# Altium PCB Power_Board.PcbDoc (part 2 of 2)
Units mm, origin at the board's own origin, x right, y up, seen from the top; angles counter-clockwise.
Board outline 220 x 160 mm, 2 copper layers (Top Layer, Bottom Layer), stack 1.58 mm thick; 209 components, 107 nets, 531 pads, 153 vias.
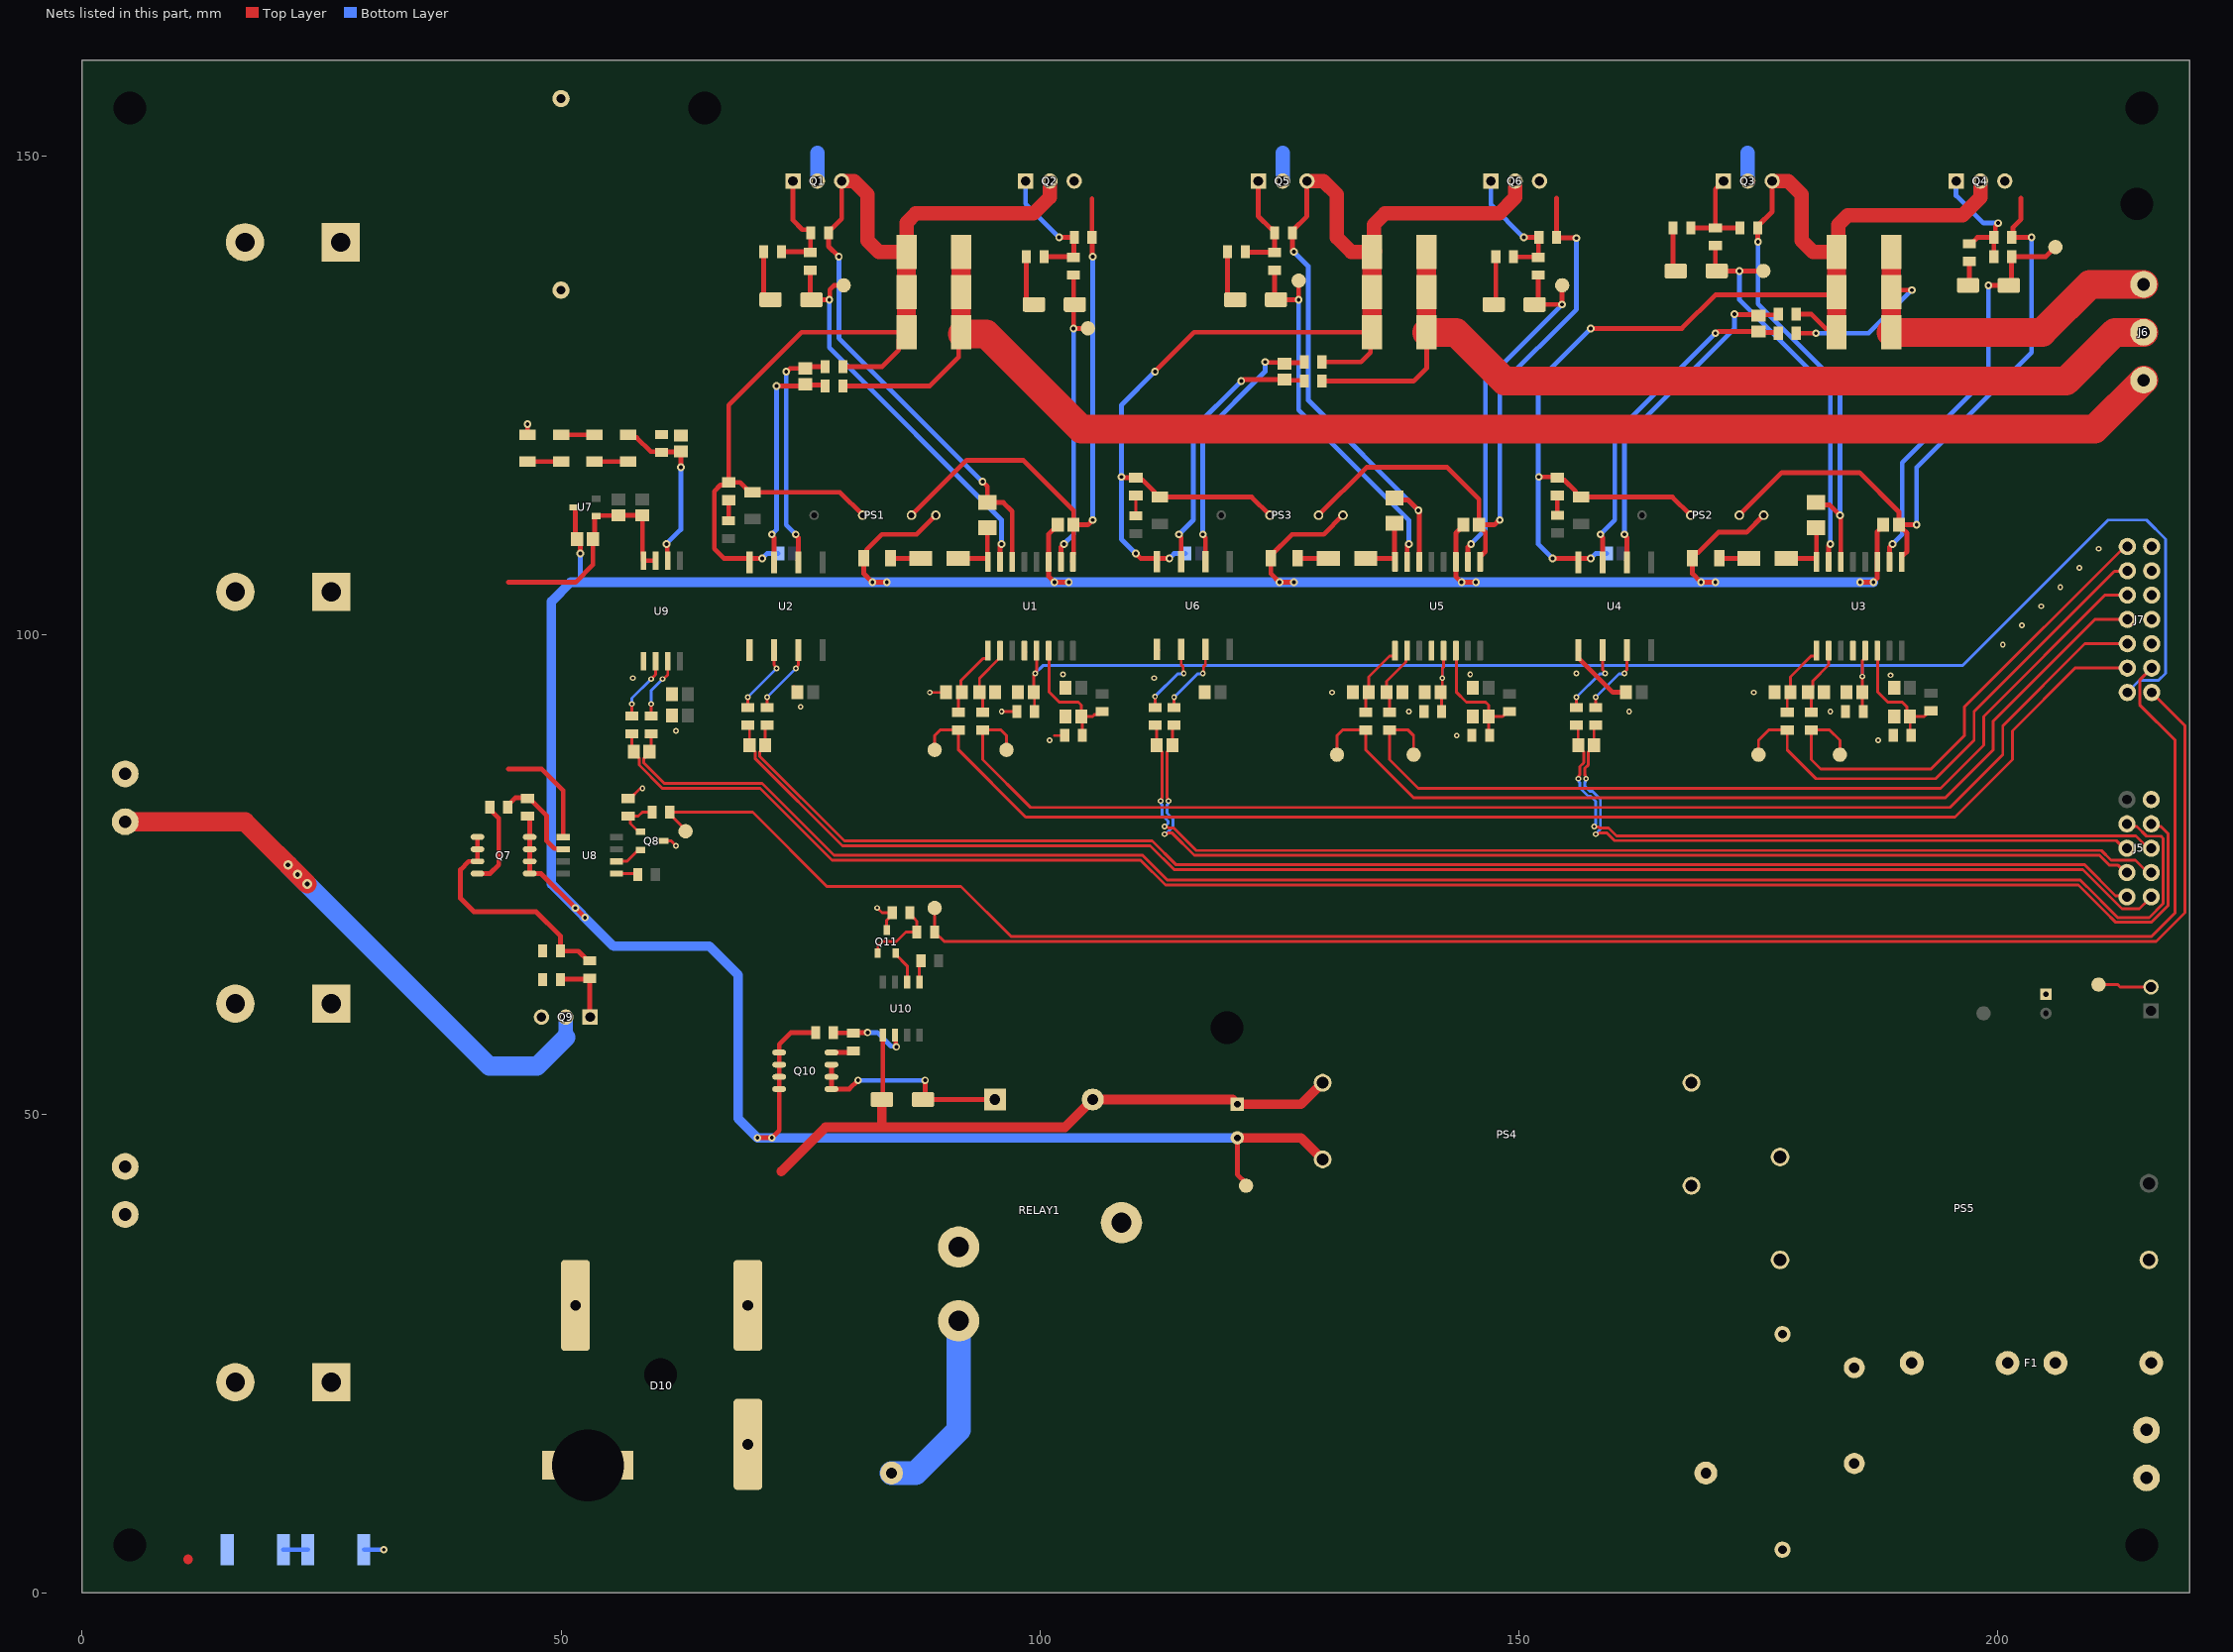
[diagram p2: the nets of this part, all layers, seen from the top]

## Via types
v1: diameter 0.8, hole 0.4, Top Layer to Bottom Layer, tented both sides, 82 vias
v2: diameter 0.6, hole 0.3, Top Layer to Bottom Layer, tented both sides, 68 vias
v3: diameter 1, hole 0.5, Top Layer to Bottom Layer, tented both sides, 3 vias

## Nets (pads, with @x,y where several pads share a name; then routed paths per layer and width w, separated by ;. In a path a pad name is that pad's centre, name@x,y a point inside that pad or via, vN(x,y) a via of type N, cw(c..) or ccw(c..) an arc to the next point about the centre after c; other vN are vias at no path point) (continued)
+12V: C3.2 C16.2 C29.2 C46.2 C48.2 PS1.1 PS2.1 PS3.1 PS4.+V Q7.5 Q7.6 Q7.7 Q7.8 Q10.5 Q10.6 Q10.7 Q10.8 R1.1 R20.1 R39.1 R62.2 R70.2 TP19.1 U1.11 U3.11 U5.11 U7.3 | length 378.4
  Top Layer w0.5: R62.2@46.5,81.075 46.725,80.85 Q7.8@46.725,78.905 Q7.7@46.725,77.635 Q7.6@46.725,76.365 Q7.5@46.725,75.095 46.744,75.076 47.924,75.076 v1(51.5,71.5) v1(52.5,70.5) ; U7.3@51.325,113.325 51.425,113.325 51.5,113.25 C48.2@51.5,110.175 ; C48.2@51.675,110 52,109.675 v1(52,108.5) ; v1(70.5,47.5) v1(72,47.5) 72.775,48.275 Q10.8@72.775,52.595 Q10.7@72.775,53.865 Q10.6@72.775,55.135 Q10.5@72.775,56.405 72.775,57.275 74,58.5 R70.2@76.575,58.5 ; v1(84,105.5) v1(82.5,105.5) 81.6,106.4 R1.1@81.6,108 81.9,108.3 81.9,108.9 83.502,110.502 87.122,110.502 PS1.1@89.12,112.5 ; C3.2@101.85,111.5 101.85,111.4 101.475,111.025 101.375,111.025 100.905,110.555 U1.11@100.905,107.64 100.905,106.095 v1(101.5,105.5) v1(103,105.5) ; C46.2@120.6,47.5 120.6,43.671 121.5,42.771 TP19.1@121.5,42.5 ; v1(126.5,105.5) v1(125,105.5) 124.1,106.4 R39.1@124.1,108 124.1,108.3 126.302,110.502 129.622,110.502 PS3.1@131.62,112.5 ; C29.2@144.175,111.5 144.175,111.4 143.405,110.63 U5.11@143.405,107.64 143.405,106.095 v1(144,105.5) v1(145.5,105.5) ; v1(170.5,105.5) v1(169,105.5) 168.1,106.4 168.1,108.3 168.4,108.6 168.7,108.6 170.822,110.722 173.762,110.722 PS2.1@175.54,112.5 ; v1(185.6,105.5) v1(187,105.5) 187,105.526 187.405,105.931 U3.11@187.405,107.64 187.405,110.805 188,111.4 C16.2@188,111.5
  Top Layer w1: C46.2@120.6,47.5 127.25,47.5 PS4.+V@129.5,45.25
  Bottom Layer w0.5: 52,105.5 v1(52,108.5)
  Bottom Layer w1: C46.2@120.6,47.5 v1(72,47.5) v1(70.5,47.5) 68.5,49.5 68.5,64.5 65.5,67.5 55.5,67.5 49,74 49,103.5 51,105.5 52,105.5 v1(82.5,105.5) v1(84,105.5) v1(101.5,105.5) v1(103,105.5) v1(125,105.5) v1(126.5,105.5) v1(144,105.5) v1(145.5,105.5) v1(169,105.5) v1(170.5,105.5) v1(185.6,105.5) v1(187,105.5)
+12V_BOOT_2: C1.1 D1.2 U1.16 | length 7.1
  Top Layer w0.5: D1.2@91.45,108 94.505,108 U1.16@94.555,107.95 ; C1.1@94.175,111.5 C1.1@94.5,111.175 94.5,108.425 94.555,108.37 U1.16@94.555,107.95 ; U1.16@94.555,107.64 U1.16@94.555,107.95
+12V_BOOT_3: C14.1 D4.2 U3.16 | length 7.4
  Top Layer w0.5: D4.2@178,108.1 D4.2@177.9,108 181.005,108 U3.16@181.055,107.95 ; C14.1@181,111.675 181.055,111.62 U3.16@181.055,107.95 ; U3.16@181.055,107.64 U3.16@181.055,107.95
+12V_BOOT_4: C27.1 D7.2 U5.16 | length 7.4
  Top Layer w0.5: D7.2@134,108 137.005,108 137.055,107.95 U5.16@137.055,107.64 ; C27.1@137,111.675 137,108.425 137.055,108.37 137.055,108.005 U5.16@137.055,107.69
+COIL_1: D11.2 Q10.1 Q10.2 Q10.3 RELAY1.A1 | length 22.3
  Top Layer w0.5: Q10.3@78.225,55.135 Q10.2@78.225,53.865 Q10.1@78.225,52.595 80.095,52.595 v1(81,53.5) ; v1(88,53.5) 88,51.73 D11.2@87.77,51.5 RELAY1.A1@95.3,51.5
  Bottom Layer w0.5: v1(81,53.5) v1(88,53.5)
+ISENSE_1_N: C24.2 J5.5 R36.2 | length 69.3
  Top Layer w0.3: v2(157,85) 156.943,85.057 156.943,85.318 156.85,85.411 156.85,86.05 157.25,86.45 157.25,87.825 157.825,88.4 157.825,90.4 R36.2@158,90.575 ; v2(158,79.2) 158.057,79.257 158.318,79.257 158.411,79.35 159.15,79.35 159.97,78.53 212.341,78.53 213.131,77.74 J5.5@213.46,77.74
  Bottom Layer w0.3: v2(157,85) 156.943,84.943 156.943,84.682 156.85,84.589 156.85,84.231 157.423,83.658 157.695,83.658 158.5,82.853 158.5,79.731 158,79.231 v2(158,79.2) ; J5.5@213.46,77.675 J5.5@213.46,77.74
+ISENSE_AUX_1: C37.2 J5.3 R55.2 | length 114.8
  Top Layer w0.3: v2(113,79.2) 113.057,79.257 113.318,79.257 113.411,79.35 113.75,79.35 116.1,77 210.599,77 211.649,75.95 212.549,75.95 213.299,75.2 J5.3@213.46,75.2 ; v2(113.4,82.671) 113.305,82.766 113.305,82.945 113.25,83 113.25,87.825 113.825,88.4 C37.2@113.825,88.5 113.825,90.4 R55.2@114,90.575
  Bottom Layer w0.3: v2(113,79.2) 113.081,79.2 113.231,79.35 113.269,79.35 113.877,79.958 113.877,80.781 113.25,81.409 113.25,82.261 113.343,82.353 113.343,82.614 v2(113.4,82.671) ; J5.3@213.379,75.2 J5.3@213.46,75.2
+ISENSE_MAIN_1: C11.2 J5.1 R17.2 | length 152.5
  Top Layer w0.3: R17.2@71.5,90.575 71.325,90.4 C11.2@71.325,88.5 71.325,88.4 70.75,87.825 70.75,87.325 79.575,78.5 111.707,78.5 114.207,76 209.059,76 212.286,72.774 213.026,72.774 213.3,72.5 J5.1@213.46,72.66
+VDC: C41.2 C42.2 C43.2 C44.2 C45.2 D10.1 J1.1 J3.1 Q1.2 Q3.2 Q5.2 R59.2 R76.2 | length 9.9
  Top Layer w0.5: R76.2@46.5,120.9 v1(46.5,122)
  Bottom Layer w1.5: Q1.2@76.75,147.4 76.75,150.35 ; Q5.2@125.32,147.4 125.32,150.32 ; 173.871,150.329 173.871,147.419 Q3.2@173.89,147.4
+VSENSE_1: C53.2 J5.7 R72.2 | length 182.2
  Top Layer w0.3: C53.2@58.8,87.375 C53.2@59.225,87.8 C53.2@59.225,87.7 ; R72.2@58.875,89.35 59.2,89.675 R72.2@59.4,89.675 59.4,87.875 C53.2@59.225,87.7 ; J5.7@213.46,80.28 213.735,80.005 214.495,80.005 215.51,78.99 217.01,78.99 217.25,78.75 217.25,71.957 215.793,70.5 212.5,70.5 211.354,71.646 210.095,72.905 208.604,74.396 113.311,74.396 110.707,77 78.5,77 71,84.5 60.775,84.5 58.65,86.625 58.65,87.125 C53.2@59.225,87.7
  Bottom Layer w0.3: J5.7@213.46,80.28 J5.7@213.839,80.28
-ISENSE_1_N: C24.1 J5.6 R38.2 | length 71.5
  Top Layer w0.3: R38.2@156,90.575 156.175,90.4 156.175,88.4 156.75,87.825 156.75,86.657 156.35,86.257 156.35,85.411 156.257,85.318 156.257,85.057 v2(156.2,85) ; v2(157.85,80) 157.907,79.943 158.318,79.943 158.411,79.85 159.357,79.85 160.177,79.03 214.382,79.03 215.672,77.74 J5.6@216,77.74
  Bottom Layer w0.3: v2(156.2,85) 156.257,84.943 156.257,84.682 156.35,84.589 156.35,84.024 157.216,83.158 157.488,83.158 158,82.645 158,80.231 157.85,80.081 v2(157.85,80) ; J5.6@215.621,77.74 J5.6@216,77.74
-ISENSE_AUX_1: C37.1 J5.4 R57.2 | length 116.8
  Top Layer w0.3: R57.2@112,90.575 112.175,90.4 C37.1@112.175,88.5 112.175,88.4 112.75,87.825 112.75,83 112.699,82.949 112.699,82.768 112.602,82.671 v2(112.6,82.671) ; v2(113,80) 113.057,79.943 113.318,79.943 113.411,79.85 113.957,79.85 116.307,77.5 210.806,77.5 211.816,76.49 214.331,76.49 215.621,75.2 J5.4@216,75.2
  Bottom Layer w0.3: v2(112.6,82.671) 112.657,82.614 112.657,82.353 112.75,82.261 112.75,81.201 113.377,80.574 113.377,80.326 113.051,80 v2(113,80) ; J5.4@215.621,75.2 J5.4@216,75.2
-ISENSE_MAIN_1: C11.1 J5.2 R19.2 | length 156.7
  Top Layer w0.3: R19.2@69.5,90.575 69.675,90.4 C11.1@69.675,88.5 69.675,88.4 70.25,87.825 70.25,87.118 79.368,78 111.5,78 114,75.5 208.852,75.5 212.942,71.41 214.75,71.41 215.755,72.415 J5.2@215.755,72.66
  Bottom Layer w0.3: J5.2@215.755,72.66 J5.2@216,72.66
-VDC: C3.1 C16.1 C29.1 C41.1 C42.1 C43.1 C44.1 C45.1 C46.1 C48.1 C49.1 C52.1 C54.1 D10.3 D11.1 J1.2 PS1.2 PS2.2 PS3.2 PS4.-V Q2.3 Q4.3 Q6.3 Q9.3 R15.1 R34.1 R53.1 R60.1 R66.2 R68.2 R80.1 RELAY1.A2 U1.9 U3.9 U5.9 U7.1 U8.5 U9.3 U9.4 U10.5 | length 311.3
  Top Layer w0.5: 44.5,86 48,86 50.225,83.775 U8.5@50.225,78.905 ; 44.5,105.5 51.5,105.5 53.325,107.325 C48.1@53.325,110 ; C48.1@53.693,109.632 C48.1@53.325,110 ; U9.3@59.865,107.75 U9.4@58.595,107.75 58.595,108.425 58.5,108.52 C52.1@58.5,112.5 C49.1@56,112.5 55.962,112.463 53.712,112.463 U7.1@53.675,112.425 53.575,112.425 53.5,112.35 53.5,110.175 C48.1@53.325,110 ; D11.1@83.5,51.5 83.595,51.595 U10.5@83.595,58.225 ; PS1.2@86.58,112.5 92.33,118.25 98.25,118.25 103.5,113 C3.1@103.5,111.5 ; U1.9@103.395,107.69 U1.9@103.445,107.64 103.445,108.37 103.5,108.425 C3.1@103.5,111.5 ; 105.425,145.545 105.425,141.3 105.462,141.262 105.462,139.538 v1(105.5,139.5) ; v1(105.5,112) 105,111.5 C3.1@103.5,111.5 ; PS3.2@129.08,112.5 134.08,117.5 142.5,117.5 145.825,114.175 C29.1@145.825,111.5 ; U5.9@145.945,107.64 145.945,108.37 145.995,108.42 146.207,108.42 146.5,108.713 146.5,110.732 146.207,111.025 146.2,111.025 145.825,111.4 C29.1@145.825,111.5 ; v1(148,112) 147.919,112 147.419,111.5 C29.1@145.825,111.5 ; 153.925,145.615 R53.1@153.925,141.5 153.961,141.464 155.964,141.464 v1(156,141.427) ; PS2.2@173,112.5 177.45,116.95 185.55,116.95 189.65,112.85 C16.1@189.65,111.5 ; U3.9@189.945,107.64 189.945,108.37 189.995,108.42 190.207,108.42 190.5,108.713 190.5,110.65 190.125,111.025 190.025,111.025 189.65,111.4 C16.1@189.65,111.5 ; v1(191.5,111.5) C16.1@189.65,111.5 ; 202.4,145.6 202.4,143.4 201.568,142.568 201.568,141.643 R34.1@201.425,141.5 v1(203.5,141.5)
  Top Layer w1: 73,44 77.6,48.6 83.5,48.6 ; D11.1@83.5,51.5 83.5,48.6 ; PS4.-V@129.5,53.25 127.25,51 C46.1@120.6,51 120.1,51.5 RELAY1.A2@105.5,51.5 102.6,48.6 83.5,48.6
  Bottom Layer w0.5: R60.1@29.425,4.5 v1(31.5,4.5) ; v1(105.5,112) v1(105.5,139.5) ; v1(148,112) 148,126 156,134 v1(156,141.427) ; v1(191.5,111.5) 191.5,117.5 203.5,129.5 v1(203.5,141.5)
-VSENSE_1: C53.1 J5.8 R74.2 | length 180.5
  Top Layer w0.3: R74.2@57.4,89.675 57.4,87.875 C53.1@57.575,87.7 ; C53.1@57.575,87.8 C53.1@57.575,87.7 ; J5.8@216,80.28 216.287,79.993 217.007,79.993 217.75,79.25 217.75,71.75 216,70 212.293,70 211.146,71.146 209.595,72.698 208.396,73.896 113.104,73.896 110.5,76.5 78.293,76.5 70.793,84 60.568,84 58.15,86.418 58.15,87.125 C53.1@57.575,87.7
  Bottom Layer w0.3: J5.8@216,80.215 J5.8@216,80.28
AC_L_FUSED_5: C40.2 F1.3 F1.4 PS4.AC_L PS5.2 R58.1 RELAY1.NO RV1.2
AC_N: C40.1 D10.4 J4.2 PS4.AC_N PS5.1 RV1.1
BRAKE_1: J7.11 R64.1 TP22.1 | length 193.8
  Top Layer w0.3: TP22.1@63,79.5 63,79.65 61.35,81.3 R64.1@61.35,81.5 70,81.5 77.75,73.75 91.75,73.75 97,68.5 216,68.5 218.5,71 218.5,89 214.79,92.71 214.79,95.29 J7.11@216.04,96.54
DISABLE_1: C6.2 C20.2 C32.2 J7.14 R11.2 R30.2 R49.2 U1.5 U3.5 U5.5 | length 166.8
  Top Layer w0.3: C6.2@99.325,94 99.325,95.744 99.5,95.919 v2(99.5,96) 99.5,96.081 99.635,96.216 U1.5@99.635,98.36 ; C6.2@99.425,93.9 R11.2@99.425,92 R11.2@99.5,91.925 ; R49.2@142,91.925 R49.2@141.925,92 141.925,93.9 C32.2@141.825,94 142,94.175 v2(142,95.5) 142,96.5 142.135,96.635 U5.5@142.135,98.36 U5.5@142.086,98.311 ; R30.2@185.925,92.2 R30.2@185.925,92 ; R30.2@186,91.925 R30.2@185.925,92 ; U3.5@186.135,98.36 186.135,97.63 185.825,97.32 v2(185.825,95.66) C20.2@185.825,94 185.825,92.1 R30.2@185.925,92
  Bottom Layer w0.3: v2(99.5,96) 100.3,96.8 142,96.8 ; v2(142,95.5) 142,96.8 ; v2(185.825,95.66) 185.825,96.775 185.8,96.8 ; J7.14@213.5,94 214.75,95.25 216.75,95.25 217.5,96 217.5,110 215.5,112 211.5,112 196.3,96.8 185.8,96.8 ; 142,96.8 185.8,96.8
GND: C2.2 C4.1 C5.1 C6.1 C7.1 C8.1 C15.2 C17.1 C18.1 C19.1 C20.1 C21.1 C28.2 C30.1 C31.1 C32.1 C33.1 C34.1 C47.1 C50.1 C51.1 J2.2 J5.10 J7.1 J7.3 J7.5 J7.7 J7.9 PS5.3 Q8.3 Q11.3 R11.1 R12.1 R30.1 R31.1 R49.1 R50.1 R67.1 R75.1 TP21.1 U1.4 U2.5 U3.4 U4.5 U5.4 U6.5 U9.5 | length 28.7
  Top Layer w0.3: R67.1@57,82.925 57.2,82.925 58.275,84 v2(58.5,84) ; Q8.3@60.7,78.5 61.5,78.5 v2(62,78) ; U2.5@69.69,98.425 U2.5@69.801,98.314 ; C8.1@74.275,94.575 74.375,94.575 74.85,94.1 C8.1@74.85,94 ; v2(83,71.5) 83.5,71 R75.1@84.575,71 84.575,70.8 84,70.225 Q11.3@84,69.2 ; v2(88.5,94) C5.1@90.175,94 ; v2(96,92) R11.1@97.575,92 ; U1.4@98.365,98.36 U1.4@98.515,98.21 ; 101.5,89.5 R12.1@102.575,89.5 ; C2.2@102.4,94.775 C2.2@102.675,94.5 ; TP21.1@210.5,63.5 212.5,63.5 212.75,63.25 J2.2@215.975,63.25
  Top Layer w0.5: C51.1@61.575,93.8 C51.1@61.575,93.9 ; U2.5@69.69,97.625 U2.5@69.69,98.425 ; C8.1@74.66,94.015 C8.1@74.675,94 ; U6.5@112.19,97.7 U6.5@112.19,98.5 U6.5@112.265,98.425 ; C34.1@117.085,94.09 C34.1@117.175,94 C34.1@117.175,94.1 ; U4.5@156.265,98.35 U4.5@156.19,98.425 156.19,97.625 159.8,94.015 161.16,94.015 C21.1@161.175,94
  Top Layer w0.8: C50.1@61.575,91.6 C50.1@61.7,91.475
  Bottom Layer w0.3: J7.7@216,101.62 J7.7@216.165,101.455
  other v2: 101,89 187.5,89 143.5,89.5 62,90 138.5,92 161.5,92 182.5,92 75,92.5 130.5,94 174.5,94 57.5,95.5 111.9,95.5 188.8,95.8 102.4,95.9 144.9,95.9 156,96 200.5,99 202.5,101 204.5,103 206.5,105 208.5,107 210.5,109
INA_1_N: J7.4 R26.1 TP9.1 | length 54.5
  Top Layer w0.3: TP9.1@175,87.5 175,89 176.075,90.075 R26.1@178,90.075 178,88 181,85 193.5,85 197.5,89 197.5,92 212.15,106.65 213.45,106.65 J7.4@213.5,106.7
INA_AUX_1: J7.8 R45.1 TP15.1 | length 98.4
  Top Layer w0.3: TP15.1@131,87.5 131,89.5 131.575,90.075 R45.1@134,90.075 134,88 139,83 194.5,83 199.5,88 199.5,91 210.12,101.62 J7.8@213.5,101.62
INA_MAIN_1: J7.12 R7.1 TP3.1 | length 139.4
  Top Layer w0.3: TP3.1@89,88 89,89.5 89.575,90.075 R7.1@91.5,90.075 91.5,88 98.5,81 195.5,81 201.5,87 201.5,90 208.04,96.54 J7.12@213.5,96.54
INB_1_N: J7.2 R27.1 TP10.1 | length 52.8
  Top Layer w0.3: TP10.1@183.5,87.5 183.5,89 182.425,90.075 R27.1@180.5,90.075 180.5,87 181.5,86 193,86 196.5,89.5 196.5,92.5 213.24,109.24 J7.2@213.5,109.24
INB_AUX_1: J7.6 R46.1 TP16.1 | length 96.2
  Top Layer w0.3: TP16.1@139,87.5 139,89.5 138.425,90.075 R46.1@136.5,90.075 136.5,87 139.5,84 194,84 198.5,88.5 198.5,91.5 211.16,104.16 J7.6@213.5,104.16
INB_MAIN_1: J7.10 R8.1 TP4.1 | length 137.7
  Top Layer w0.3: TP4.1@96.5,88 96.5,89.5 95.925,90.075 R8.1@94,90.075 94,87 99,82 195,82 200.5,87.5 200.5,90.5 209.08,99.08 J7.10@213.5,99.08
MIDPOINT_2: C1.2 C9.1 D12.2 PS1.4 Q1.3 Q2.2 R5.1 R6.1 R9.1 R10.1 R16.1 R82.2 U1.14 U2.4 | length 161.3
  Top Layer w0.5: U2.4@69.673,107.908 69.765,108 v1(71,108) ; U2.4@69.69,107.575 69.69,107.925 69.615,108 67,108 66,109 66,115 66.65,115.65 67.225,115.65 D12.2@67.5,115.925 ; v1(79,139.5) 77.925,140.575 R5.1@77.925,142 77.925,142.2 78.15,142.425 78.257,142.425 79.29,143.458 Q1.3@79.29,147.4 ; R16.1@79.425,128 79.425,127.8 79.625,128 83.5,128 85.25,129.75 85.25,130.795 R6.1@86.055,131.6 ; PS1.4@81.5,112.5 79.1,114.9 69.7,114.9 68.675,115.925 D12.2@67.5,115.925 ; R6.1@86.055,131.695 R6.1@86.055,131.6 ; v1(94,116) 94.5,115.5 C1.2@94.5,113.825 ; C1.2@94.325,114 C1.2@94.5,113.825 ; U1.14@97.095,107.64 97.095,112.905 96.175,113.825 C1.2@94.5,113.825 ; D12.2@67.5,115.925 67.5,124 75.1,131.6 R6.1@86.055,131.6
  Top Layer w1.5: Q1.3@79.29,147.4 80.6,147.4 82,146 82,141.172 83.172,140 R10.1@86.055,140 86.055,143.055 87,144 99.328,144 101,145.672 101,147.299 101.011,147.31 101.011,147.354 101.03,147.373 Q2.2@101.03,147.4
  Top Layer w2: R6.1@86.055,131.695 R9.1@86.055,135.8 R10.1@86.055,140
  Bottom Layer w0.5: v1(71,108) 71.5,108.5 C9.1@72.675,108.5 ; v1(79,139.5) 79,131 v1(94,116)
MIDPOINT_3: C14.2 C22.1 D13.2 PS2.4 Q3.3 Q4.2 R24.1 R25.1 R28.1 R29.1 R35.1 R84.2 U3.14 U4.4 | length 171.9
  Top Layer w0.5: v1(152.07,116.5) 153.925,116.5 D13.2@154,116.425 154.275,116.15 154.75,116.15 155.9,115 155.9,114.7 156.2,114.4 R84.2@156.5,114.4 166.02,114.4 PS2.4@167.92,112.5 ; v1(153.5,108) 156.115,108 U4.4@156.19,107.925 ; U4.4@156.19,107.575 U4.4@156.19,107.925 ; v1(157.5,108) 156.265,108 U4.4@156.19,107.925 ; v1(157.5,132) 167,132 170.5,135.5 182.85,135.5 R28.1@183.15,135.8 ; v1(174.953,141.047) 174.925,141.075 R24.1@174.925,142.5 174.925,142.7 176.43,144.205 Q3.3@176.43,147.4 ; R35.1@178.925,133.5 180.5,133.5 182,132 182.75,132 R25.1@183.15,131.6 ; C14.2@181,113.825 181.232,113.593 182.407,113.593 v1(183.5,112.5) 183.595,112.405 U3.14@183.595,107.64
  Top Layer w1.5: Q3.3@176.43,147.4 178.1,147.4 179.5,146 179.5,141.172 180.672,140 R29.1@183.15,140 183.336,140.186 183.336,142.836 184.3,143.8 196.298,143.8 198.17,145.672 Q4.2@198.17,147.4
  Top Layer w2: R25.1@183.15,131.6 R28.1@183.15,135.8 R29.1@183.15,140
  Bottom Layer w0.5: v1@152.029,116.541 v1(152.07,116.5) ; v1(153.5,108) 152,109.5 152,126.5 v1(157.5,132) ; v1(157.5,108) 158,108.5 C22.1@159.175,108.5 ; v1(174.953,141.047) 174.953,134.547 183.5,126 v1(183.5,112.5)
MIDPOINT_4: C27.2 C35.1 D14.2 PS3.4 Q5.3 Q6.2 R43.1 R44.1 R47.1 R48.1 R54.1 R86.2 U5.14 U6.4 | length 166.3
  Top Layer w0.5: v1(108.5,116.5) 108.575,116.425 D14.2@110,116.425 110.275,116.15 110.75,116.15 111.9,115 111.9,114.7 112.2,114.4 R86.2@112.5,114.4 122.1,114.4 PS3.4@124,112.5 ; v1(110,108.5) 110.5,108 112.115,108 U6.4@112.19,107.925 ; v1(112,127.5) 116.1,131.6 R47.1@134.5,131.6 ; U6.4@112.19,107.65 U6.4@112.19,107.925 ; v1(113.5,108) 112.265,108 U6.4@112.19,107.925 ; v1(126.5,140) 126.35,140.15 R43.1@126.35,142 126.35,142.2 127.86,143.71 Q5.3@127.86,147.4 ; R54.1@129.425,128.5 133.5,128.5 134.5,129.5 R47.1@134.5,131.6 ; R47.1@134.65,131.6 R47.1@134.5,131.6 ; C27.2@137,114.325 137.232,114.093 138.407,114.093 139.595,112.905 U5.14@139.595,107.64
  Top Layer w1.5: Q5.3@127.86,147.4 129.6,147.4 131,146 131,141.5 132.5,140 R48.1@134.65,140 ; R48.1@134.705,140.055 134.836,140.186 134.836,142.836 136,144 147.928,144 149.6,145.672 Q6.2@149.6,147.4
  Top Layer w2: R47.1@134.65,131.945 R44.1@134.65,135.8 R48.1@134.65,140 R48.1@134.705,140.055
  Bottom Layer w0.5: v1(110,108.5) 108.5,110 108.5,124 v1(112,127.5) ; v1(113.5,108) 114,108.5 C35.1@115.175,108.5 ; v1(126.5,140) 128,138.5 128,124.5 v1(139.5,113)
NetC4_2: C4.2 R8.2 U1.2 | length 7.3
  Top Layer w0.3: C4.2@93.675,94 93.675,95.48 95.825,97.63 U1.2@95.825,98.36 ; R8.2@94,92 C4.2@94,94
NetC5_2: C5.2 R7.2 U1.1 | length 7.7
  Top Layer w0.3: R7.2@91.5,91.925 91.5,93.675 C5.2@91.825,94 ; C5.2@91.745,94.245 91.745,95.245 94.046,97.546 94.405,97.546 94.555,97.696 U1.1@94.555,98.36
NetC7_2: C7.2 R4.1 R12.2 U1.6 | length 14.4
  Top Layer w0.3: U1.6@100.905,98.36 100.953,98.313 100.953,94.048 102,93 104,93 104.325,92.675 C7.2@104.325,91.5 ; R12.2@104.425,89 R12.2@104.638,89.213 ; R12.2@104.425,89.5 C7.2@104.425,91.4 ; C7.2@104.563,91.262 C7.2@104.425,91.4 ; R4.1@106.5,92 106.175,91.675 105.675,91.675 105.5,91.5 C7.2@104.325,91.5 ; C7.2@104.325,91.5 C7.2@104.425,91.4
NetC10_1: C10.1 R18.2 U2.3 | length 23.7
  Top Layer w0.5: v1(72,110.5) 72,110.419 72.23,110.189 U2.3@72.23,107.575 ; v1(72.5,126) 75.325,126 C10.1@75.5,126.175 ; C10.1@75.587,126.087 R18.2@77.488,126.087
  Bottom Layer w0.5: v1(72,110.5) 72.5,111 v1(72.5,126)
NetC10_2: C10.2 R16.2 U2.2 | length 24.6
  Top Layer w0.5: v1(73.5,127.5) 73.581,127.5 73.906,127.825 C10.2@75.5,127.825 ; v1(74.5,110.5) 74.5,110.419 74.77,110.149 U2.2@74.77,107.575 ; C10.2@75.572,128 R16.2@77.575,128
  Bottom Layer w0.5: v1(73.5,127.5) 73.5,111.5 v1(74.5,110.5)
NetC17_2: C17.2 R27.2 U3.2 | length 7.6
  Top Layer w0.3: R27.2@180.575,92 R27.2@180.5,91.925 180.5,93.675 C17.2@180.175,94 180.65,94.475 180.65,95.19 182.325,96.865 U3.2@182.325,98.36
NetC18_2: C18.2 R26.2 U3.1 | length 7.9
  Top Layer w0.3: R26.2@178,91.925 178,93.675 C18.2@178.325,94 178.325,95.63 180.481,97.786 180.905,97.786 181.055,97.936 U3.1@181.055,98.36
NetC19_2: C19.2 R23.1 R31.2 U3.6 | length 13.7
  Top Layer w0.3: U3.6@187.405,98.36 187.453,98.312 187.453,96.548 187.453,94.048 188.5,93 190,93 190.5,92.5 190.5,91.825 C19.2@190.825,91.5 ; R31.2@190.925,89.5 190.825,89.6 C19.2@190.825,91.5 ; R23.1@193,92.075 192.8,92.075 192.475,91.75 192.475,91.676 192.299,91.5 C19.2@190.825,91.5
NetC23_1: C23.1 R37.2 U4.3 | length 35.7
  Top Layer w0.5: v1(158.5,110.5) 158.5,110.419 158.73,110.189 U4.3@158.73,107.575 ; v1(170.5,131.5) 170.581,131.5 170.756,131.675 C23.1@175,131.675 175.088,131.588 176.987,131.588 R37.2@177.075,131.5
  Bottom Layer w0.5: v1(158.5,110.5) 160,112 160,121 v1(170.5,131.5)
NetC23_2: C23.2 R35.2 U4.2 | length 35.5
  Top Layer w0.5: v1(161,110.5) 161,110.419 161.27,110.149 U4.2@161.27,107.575 ; v1(172.5,133.5) 172.557,133.443 174.882,133.443 C23.2@175,133.325 175.088,133.413 176.987,133.413 R35.2@177.075,133.5
  Bottom Layer w0.5: v1(161,110.5) 161,120.5 172.5,132 v1(172.5,133.5)
NetC30_2: C30.2 R46.2 U5.2 | length 7.6
  Top Layer w0.3: R46.2@136.575,92 R46.2@136.5,91.925 136.5,93.675 C30.2@136.175,94 136.175,95.175 138.181,97.181 138.181,98.216 U5.2@138.325,98.36
NetC31_2: C31.2 R45.2 U5.1 | length 8.1
  Top Layer w0.3: R45.2@133.925,92 R45.2@134,91.925 134,93.675 C31.2@134.325,94 134.325,95.63 136.481,97.786 136.905,97.786 137.055,97.936 U5.1@137.055,98.36
NetC33_2: C33.2 R42.1 R50.2 U5.6 | length 13.8
  Top Layer w0.3: U5.6@143.405,98.36 143.452,98.312 143.452,94.048 144.5,93 146.5,93 146.825,92.675 C33.2@146.825,91.525 ; R50.2@146.875,89.55 146.825,89.6 C33.2@146.825,91.5 148.3,91.5 148.8,92 R42.1@149,92
  Top Layer w0.5: R50.2@146.875,89.55 R50.2@146.925,89.5
NetC36_1: C36.1 R56.2 U6.3 | length 28.4
  Top Layer w0.5: v1(114.5,110.5) 114.5,110.419 114.73,110.189 U6.3@114.73,107.65 ; v1(121,126.5) 121.081,126.5 121.256,126.675 C36.1@125.5,126.675 125.587,126.588 127.487,126.588 R56.2@127.575,126.5
  Bottom Layer w0.5: v1(114.5,110.5) 116,112 116,121.5 v1(121,126.5)
NetC36_2: C36.2 R54.2 U6.2 | length 27.8
  Top Layer w0.5: v1(117,110.5) 117,110.419 117.27,110.149 U6.2@117.27,107.65 ; v1(123.5,128.5) 123.557,128.443 125.382,128.443 125.412,128.413 127.487,128.413 R54.2@127.575,128.5
  Bottom Layer w0.5: v1(117,110.5) 117,121 123.5,127.5 v1(123.5,128.5)
NetD1_1: D1.1 R1.2 | length 3.8
  Top Layer w0.5: R1.2@84.4,108 D1.1@87.55,108 D1.1@87.1,107.55
NetD2_1: D2.1 R2.1 | length 5.4
  Top Layer w0.5: R2.1@71.15,140 71.15,135.525 71.675,135 D2.1@71.865,135
NetD3_1: D3.1 R13.1 | length 5.5
  Top Layer w0.5: R13.1@98.575,139.365 98.575,134.89 99.1,134.365 D3.1@99.365,134.365
NetD4_1: D4.1 R20.2 | length 3.1
  Top Layer w0.5: R20.2@170.9,108 D4.1@174,108
NetD5_1: D5.1 R21.1 | length 4.6
  Top Layer w0.5: R21.1@166.075,142.5 166.075,138.29 D5.1@166.365,138
NetD6_1: D6.1 R32.1 | length 2.6
  Top Layer w0.5: D6.1@196.865,136.5 197,136.635 R32.1@197,139
NetD7_1: D7.1 R39.2 | length 3.2
  Top Layer w0.5: R39.2@126.9,108 D7.1@130.1,108
NetD8_1: D8.1 R40.1 | length 5.5
  Top Layer w0.5: R40.1@119.575,140 119.575,135.525 120.1,135 D8.1@120.365,135
NetD9_1: D9.1 R51.1 | length 4.6
  Top Layer w0.5: D9.1@147.365,134.5 147.575,134.71 R51.1@147.575,139
NetD10_2: D10.2 RELAY1.COM
NetD12_1: D12.1 R81.2 | length 2.2
  Top Layer w0.5: R81.2@67.5,111.925 D12.1@67.5,114.075
NetD13_1: D13.1 R83.2 | length 2.1
  Top Layer w0.5: R83.2@154,112.5 D13.1@154,114.575
NetD14_1: D14.1 R85.2 | length 2.2
  Top Layer w0.3: R85.2@110,112.425 D14.1@110,114.575
NetF1_1: F1.1 F1.2 J4.1
NetJ3_2: J3.2 Q9.2 | length 62.7
  Top Layer w2: J3.2@4.5,80.5 17,80.5 v3(23.5,74)
  Bottom Layer w1.5: 50.5,58 Q9.2@50.5,60.1
  Bottom Layer w2: v3(21.5,76) 42.5,55 47.5,55 50.5,58
  other v3: 22.5,75
NetQ1_1: Q1.1 R2.2 R3.2 R5.2 | length 11.7
  Top Layer w0.5: R2.2@73,140 R3.2@76,140 ; Q1.1@74.21,147.4 74.21,143.29 75.182,142.318 75.85,142.318 76.075,142.093 R5.2@76.075,142 76.038,141.962 76.038,139.962 R3.2@76,139.925
NetQ2_1: Q2.1 R13.2 R14.2 R15.2 | length 14.1
  Top Layer w0.5: R13.2@100.425,139.5 103.425,139.5 R14.2@103.5,139.425 ; v1(102,141.5) 103.44,141.5 103.575,141.365 103.538,141.328 R14.2@103.538,139.328
  Bottom Layer w0.5: Q2.1@98.49,147.4 98.49,145.01 v1(102,141.5)
NetQ3_1: Q3.1 R21.2 R22.2 R24.2 | length 10.4
  Top Layer w0.5: R21.2@167.925,142.5 R22.2@170.5,142.5 ; Q3.1@171.35,147.4 170.5,146.55 R22.2@170.5,142.5 ; R24.2@173.075,142.5 R22.2@170.5,142.5
NetQ4_1: Q4.1 R32.2 R33.2 R34.2 | length 13.6
  Top Layer w0.5: R32.2@197,140.85 197.2,140.85 197.85,141.5 R34.2@199.575,141.5 ; R33.2@199.575,139.5 R34.2@199.575,141.5 ; v1(200,143) 200,142.919 199.729,142.647 199.729,141.654 R34.2@199.575,141.5
  Bottom Layer w0.5: Q4.1@195.63,147.4 195.63,145.87 198.5,143 v1(200,143)
NetQ5_1: Q5.1 R40.2 R41.2 R43.2 | length 11.4
  Top Layer w0.5: R40.2@121.425,140 121.463,139.962 124.462,139.962 R41.2@124.5,139.925 124.5,142.2 124.275,142.425 124.075,142.425 122.78,143.72 Q5.1@122.78,147.4
NetQ6_1: Q6.1 R51.2 R52.2 R53.2 | length 13.6
  Top Layer w0.5: R51.2@149.425,139.5 149.463,139.462 151.963,139.462 R52.2@152,139.425 152.037,139.462 152.037,141.462 R53.2@152.075,141.5 v1(150.5,141.5)
  Bottom Layer w0.5: Q6.1@147.06,147.4 147.06,144.94 v1(150.5,141.5)
NetQ7_1: Q7.4 R63.1 | length 9
  Top Layer w0.5: Q7.4@41.275,75.095 42.595,75.095 43.5,76 43.5,80.875 42.575,81.8 R63.1@42.575,82
NetQ7_3: Q7.1 Q7.2 Q7.3 R65.2 R66.1 | length 24.8
  Top Layer w0.5: Q7.1@41.275,78.905 Q7.2@41.275,77.635 Q7.3@41.275,76.365 40.365,76.365 39.5,75.5 39.5,72.5 40.895,71.105 47.395,71.105 49.925,68.575 R66.1@49.925,67 51.8,67 52.8,66 R65.2@53,66
NetQ8_1: Q8.1 R64.2 R67.2 | length 5.2
  Top Layer w0.3: R67.2@57,81.075 R67.2@57.2,81.075 ; Q8.1@58.575,79.625 58.4,79.45 Q8.1@58.3,79.45 58.125,79.45 57.249,80.326 57.249,81.026 R67.2@57.2,81.075 ; R64.2@59.5,81.5 58.5,81.5 58.075,81.075 R67.2@57.2,81.075
NetQ8_2: Q8.2 U8.2 | length 3
  Top Layer w0.3: U8.2@55.775,76.365 56.865,76.365 57.875,77.375 58.125,77.375 Q8.2@58.3,77.55
NetQ9_1: Q9.1 R65.1 R68.1 | length 7.2
  Top Layer w0.5: R68.1@49.925,64 50,64.075 52.925,64.075 R65.1@53,64.15 53,60.14 Q9.1@53.04,60.1
NetQ10_1: Q10.4 R71.1 | length 2.3
  Top Layer w0.5: Q10.4@78.225,56.405 78.244,56.424 80.349,56.424 R71.1@80.5,56.575
NetQ11_1: Q11.1 R73.2 R75.2 | length 7.8
  Top Layer w0.3: Q11.1@83.05,66.8 83.074,66.824 83.074,67.574 83.5,68 85,68 86,69 R73.2@87.15,69 87.15,70.125 86.8,70.475 86.75,70.475 86.425,70.8 R75.2@86.425,71
NetQ11_2: Q11.2 U10.2 | length 3.5
  Top Layer w0.3: Q11.2@84.95,66.8 84.95,66.625 86.135,65.44 U10.2@86.135,63.775
NetR17_1: R17.1 U2.7 | length 7.4
  Top Layer w0.3: R17.1@71.5,92.425 v2(71.5,93.5) ; v2(74.5,96.5) 74.5,96.58 74.77,96.85 U2.7@74.77,98.425
  Bottom Layer w0.3: v2(71.5,93.5) v2(74.5,96.5)
NetR19_1: R19.1 U2.6 | length 7.4
  Top Layer w0.3: R19.1@69.5,92.425 v2(69.5,93.5) ; U2.6@72.23,98.425 72.23,96.85 72.5,96.58 v2(72.5,96.5)
  Bottom Layer w0.3: v2(69.5,93.5) v2(72.5,96.5)
NetR36_1: R36.1 U4.7 | length 7.6
  Top Layer w0.3: R36.1@158,92.425 v2(158,93.5) ; v2(161,96) 161,96.081 161.27,96.351 U4.7@161.27,98.425
  Bottom Layer w0.3: v2(158,93.5) 160.443,95.943 160.943,95.943 v2(161,96)
NetR38_1: R38.1 U4.6 | length 7.6
  Top Layer w0.3: R38.1@156,92.425 v2(156,93.5) ; U4.6@158.73,98.425 158.73,96.351 159,96.081 v2(159,96)
  Bottom Layer w0.3: v2(156,93.5) 158.443,95.943 158.943,95.943 v2(159,96)
NetR55_1: R55.1 U6.7 | length 7.7
  Top Layer w0.3: R55.1@114,92.425 v2(114,93.5) ; v2(117,96) 117.057,96.057 117.057,96.687 117.27,96.9 U6.7@117.27,98.5
  Bottom Layer w0.3: v2(114,93.5) 116.443,95.943 116.943,95.943 v2(117,96)
NetR57_1: R57.1 U6.6 | length 7.8
  Top Layer w0.3: R57.1@112,92.425 v2(112,93.575) ; U6.6@114.73,98.5 114.73,96.9 114.943,96.687 114.943,96.057 v2(115,96)
  Bottom Layer w0.3: v2(112,93.575) 114.368,95.943 114.943,95.943 v2(115,96)
NetR58_2: R58.2 RELAY1.NC | length 20.3
  Bottom Layer w2.5: R58.2@84.5,12.5 87,12.5 91.5,17 RELAY1.NC@91.5,28.4
NetR59_1: R59.1 R60.2 | length 2.6
  Bottom Layer w0.5: R59.1@21,4.5 R60.2@23.575,4.5
NetR61_1: R61.1 U8.1 | length 2.3
  Top Layer w0.3: U8.1@55.775,75.095 57.905,75.095 R61.1@58,75
NetR62_1: R62.1 R63.2 U8.6 | length 10.1
  Top Layer w0.5: R63.2@44.425,82 44.425,82.2 45.225,83 46.425,83 R62.1@46.5,82.925 46.7,82.925 48.5,81.125 48.5,78.5 49.29,77.71 50.15,77.71 U8.6@50.225,77.635
NetR69_1: R69.1 U10.1 | length 2.3
  Top Layer w0.3: U10.1@87.405,63.775 87.405,65.83 R69.1@87.575,66
NetR70_1: R70.1 R71.2 U10.6 | length 8.5
  Top Layer w0.5: R70.1@78.425,58.5 78.462,58.462 80.462,58.462 R71.2@80.5,58.425 80.575,58.5 v1(82,58.5) ; U10.6@84.865,58.225 84.94,58.15 84.94,57.141 85,57.081 v1(85,57)
  Bottom Layer w0.5: v1(82,58.5) 83,58.5 84.443,57.057 84.943,57.057 v1(85,57)
NetR76_1: R76.1 R77.1 | length 3.5
  Top Layer w0.5: R76.1@46.5,118.1 R77.1@50,118.1
NetR77_2: R77.2 R78.2 | length 3.5
  Top Layer w0.5: R77.2@50,120.9 R78.2@53.5,120.9
NetR78_1: R78.1 R79.1 | length 3.5
  Top Layer w0.5: R78.1@53.5,118.1 R79.1@57,118.1
OUT_1_N: J6.3 R25.2 R28.2 R29.2 R37.1 | length 53
  Top Layer w0.5: R37.1@178.925,131.5 v1(181,131.5) ; R28.2@188.85,135.8 189.05,136 v1(191,136)
  Top Layer w2: R25.2@188.85,131.6 R28.2@188.85,135.8 R29.2@188.85,140
  Top Layer w3: R25.2@188.85,131.6 204.6,131.6 209.6,136.6 J6.3@215.2,136.6
  Bottom Layer w0.5: v1(181,131.5) 186.5,131.5 v1(191,136)
OUT_AUX_1: J6.2 R44.2 R47.2 R48.2 R56.1 | length 102.7
  Top Layer w0.5: R56.1@129.425,126.5 139,126.5 140.35,127.85 R47.2@140.35,131.6
  Top Layer w2: R47.2@140.35,131.6 R44.2@140.35,135.8 R48.2@140.35,140
  Top Layer w3: R47.2@140.35,131.6 143.4,131.6 148.5,126.5 207.1,126.5 212.2,131.6 J6.2@215.2,131.6
OUT_MAIN_1: J6.1 R6.2 R9.2 R10.2 R18.1 | length 154.3
  Top Layer w0.5: R18.1@79.425,125.8 R18.1@79.425,126 88.5,126 91.5,129 91.5,131.041 R6.2@91.907,131.448
  Top Layer w2: R6.2@91.755,131.6 R9.2@91.755,135.8 R10.2@91.755,140
  Top Layer w2.5: R6.2@91.755,131.6 R6.2@91.907,131.448
  Top Layer w3: R6.2@91.907,131.448 94.352,131.448 104.3,121.5 210.1,121.5 J6.1@215.2,126.6
OUTA_2: D2.2 R3.1 TP2.1 U1.15 | length 42.6
  Top Layer w0.5: R3.1@76,138.075 76,135.135 D2.2@76.135,135 v1(78,135) 78.057,135.057 78.057,136.057 78.5,136.5 TP2.1@79.5,136.5 ; U1.15@95.825,107.64 95.825,109.263 95.981,109.419 v1(95.981,109.5)
  Bottom Layer w0.5: v1(78,135) 78,130 95.981,112.019 v1(95.981,109.5)
OUTA_3: D5.2 R22.1 TP8.1 U3.15 | length 42
  Top Layer w0.5: R22.1@170.5,140.65 170.5,138.135 D5.2@170.635,138 v1(173,138) ; v1@173.057,138.057 v1(173,138) ; TP8.1@175.5,138 v1(173,138) ; U3.15@182.325,107.64 182.325,109.325 v1(182.5,109.5)
  Bottom Layer w0.5: v1(173,138) 173,135 182.5,125.5 v1(182.5,109.5)
OUTA_4: D8.2 R41.1 TP14.1 U5.15 | length 39.7
  Top Layer w0.5: R41.1@124.5,138.075 124.5,135.135 D8.2@124.635,135 v1(127,135) TP14.1@127,137 ; U5.15@138.325,107.64 138.325,109.325 v1(138.5,109.5)
  Bottom Layer w0.5: v1(127,135) 127,123.5 138.5,112 v1(138.5,109.5)
OUTB_2: D3.2 R14.1 TP6.1 U1.10 | length 31.9
  Top Layer w0.5: U1.10@102.175,107.64 102.175,109.175 v1(102.5,109.5) ; D3.2@103.5,134.5 R14.1@103.5,137.44 ; D3.2@103.635,134.5 103.5,134.365 v1(103.5,132) TP6.1@105,132
  Bottom Layer w0.5: v1(102.5,109.5) 103.5,110.5 v1(103.5,132)
OUTB_3: D6.2 R33.1 TP12.1 U3.10 | length 43.4
  Top Layer w0.5: U3.10@188.675,107.64 188.675,109.175 v1(189,109.5) ; v1(199,136.5) D6.2@201.135,136.5 201.425,136.79 R33.1@201.425,139.5 205,139.5 TP12.1@206,140.5
  Bottom Layer w0.5: v1(189,109.5) 190,110.5 190,118 199,127 v1(199,136.5)
OUTB_4: D9.2 R52.1 TP18.1 U5.10 | length 39
  Top Layer w0.5: U5.10@144.675,107.64 144.675,109.175 v1(145,109.5) ; R52.1@152,137.575 152,134.865 D9.2@151.635,134.5 v1(154.5,134.5) TP18.1@154.5,136.5
  Bottom Layer w0.5: v1(145,109.5) 146.5,111 146.5,126.5 v1(154.5,134.5)
OUTN_6: R74.1 U9.6 | length 6.7
  Top Layer w0.3: R74.1@57.4,91.525 v2(57.4,92.8) ; v2(59.4,95.4) 59.865,95.865 U9.6@59.865,97.25
  Bottom Layer w0.3: v2(57.4,92.8) 57.4,93.4 v2(59.4,95.4)
OUTP_6: R72.1 U9.7 | length 6.5
  Top Layer w0.3: R72.1@59.4,91.525 v2(59.4,92.8) ; v2(60.6,95.4) 60.657,95.457 60.767,95.457 61.135,95.825 U9.7@61.135,97.25
  Bottom Layer w0.3: v2(59.4,92.8) 59.4,94.2 v2(60.6,95.4)
PRECHARGE_1: J7.13 R73.1 TP23.1 | length 159.1
  Top Layer w0.3: TP23.1@89,71.5 R73.1@89,69 90,68 216.5,68 219.5,71 219.5,90.54 J7.13@216.04,94
V_MEAS_6: C54.2 R79.2 R80.2 U9.2 | length 18.7
  Top Layer w0.5: R79.2@57,120.9 57.3,120.6 57.9,120.6 59.368,119.132 60.443,119.132 R80.2@60.5,119.075 60.55,119.125 62.45,119.125 C54.2@62.5,119.175 v1(62.5,117.5) ; v1(61,109.5) 61,109.419 61.085,109.334 61.085,107.8 U9.2@61.135,107.75
  Bottom Layer w0.5: v1(61,109.5) 62.5,111 v1@62.5,117.772
pads on no net: MH1.2 MH2.2 MH3.2 MH4.2 MH5.2 MH6.2 MH7.2 MH8.2 U1.7 U1.12 U1.13 U3.7 U3.12 U3.13 U5.7 U5.12 U5.13 U8.3 U8.4 U8.7 U8.8 U10.3 U10.4 U10.7 U10.8

## Polygon pours and split planes (outlines as drawn)
GND on Top Layer "GND_L01_P026" (solid, pour order 26): 56.5,87 56.5,98.5 58,100 197,100 210,113 219,113 219,97.5 214.5,97.5 214.5,110.5 213,110.5 195.5,93 195.5,90 192.5,87
-VDC on Top Layer "VDC-" (solid, pour order 22): 68,141.5 72,145.5 208,145.5 208,158 2,158 2,2 36.8,2 36.8,36.6 39,38.8 61.8,38.8 64,36.6 64,24 74.2,24 74.2,44.5 69,44.5 65.5,48 65.5,59.5 62.5,62.5 49,62.5 49,68 45,72 45,118.5 44,119.5 44,126 45,127 46.697,127 53.5,127 60,120.5 63,120.5 65,122.5 65,124.5 68,127.5
NetF1_1 on Top Layer "NETF1_1_L01_P024" (solid, pour order 24): 218,15.5 204,15.5 204,28.5 218,28.5
AC_N on Top Layer "AC_N" (solid, pour order 11): 39,34.996 39,2 218,2 218,13.5 199.5,13.5 199.5,28.4 196.6,28.4 194.6,30.4 194.6,54 192.6,56 145.4,56 129.2,39.8 118,39.8 112.2,34 100,34 100,9 61.5,9 61.5,35.5 60.5,36.5 40.429,36.5
NetD10_2 on Top Layer "NetD10_2" (solid, pour order 16): 64,10.5 64,22 76.5,22 77,22.5 77,44 79.4,46.4 111.5,46.4 111.5,36 105.5,36 105,36 101,40 88.8,40 86.8,38 86.8,19.4 77.9,10.5
GND on Bottom Layer "GND_L02_P025" (solid, pour order 25): 219,33.5 200.5,33.5 199.5,34.5 199.5,56 192.5,63 81.5,63 70,74.5 55.5,74.5 55.5,97.5 58,100 197,100 210,113 219,113
+VDC on Bottom Layer "VDC+" (solid, remove dead copper, pour order 21): 57.5,120 57.5,120.1 66.6,129.2 66.599,145.201 70.2,149 175,149 175,158 2,158 2,2 62.4,2 62.4,47.8 57.813,52.387 45,52.387 45,107.5
AC_L_FUSED_5 on Bottom Layer "AC_L_FUSED" (solid, pour order 9): 118,39.8 112.8,45 81.2,45 77,40.8 77,2 203,2 203,28.4 196.6,28.4 194.6,30.4 194.6,54 192.6,56 145.4,56 129.2,39.8

## Silkscreen, mask and mechanical layers (free items; w line width, h text height)
Mechanical 1:
  lines w0.254: 60,159.991 60,150 220,150 ; 40,2 40,43 81,43 81,2 40,2 ; 43,47 43,63.5 44,63.5 44,57.5 57,57.5 57,63.5 58,63.5 58,47 43,47
Board Shape:
  the board outline again, w0.254